# Altium PCB Pukk-Display-Module-v1.0.PcbDoc (part 3 of 5)
Units mil, origin at the board's own origin, x right, y up, seen from the top; angles counter-clockwise.
Board outline 3740.16 x 1574.8 mil, 4 copper layers (Top Layer, GND, POWER, Bottom Layer), stack 61.653 mil thick; 157 components, 115 nets, 640 pads, 314 vias.
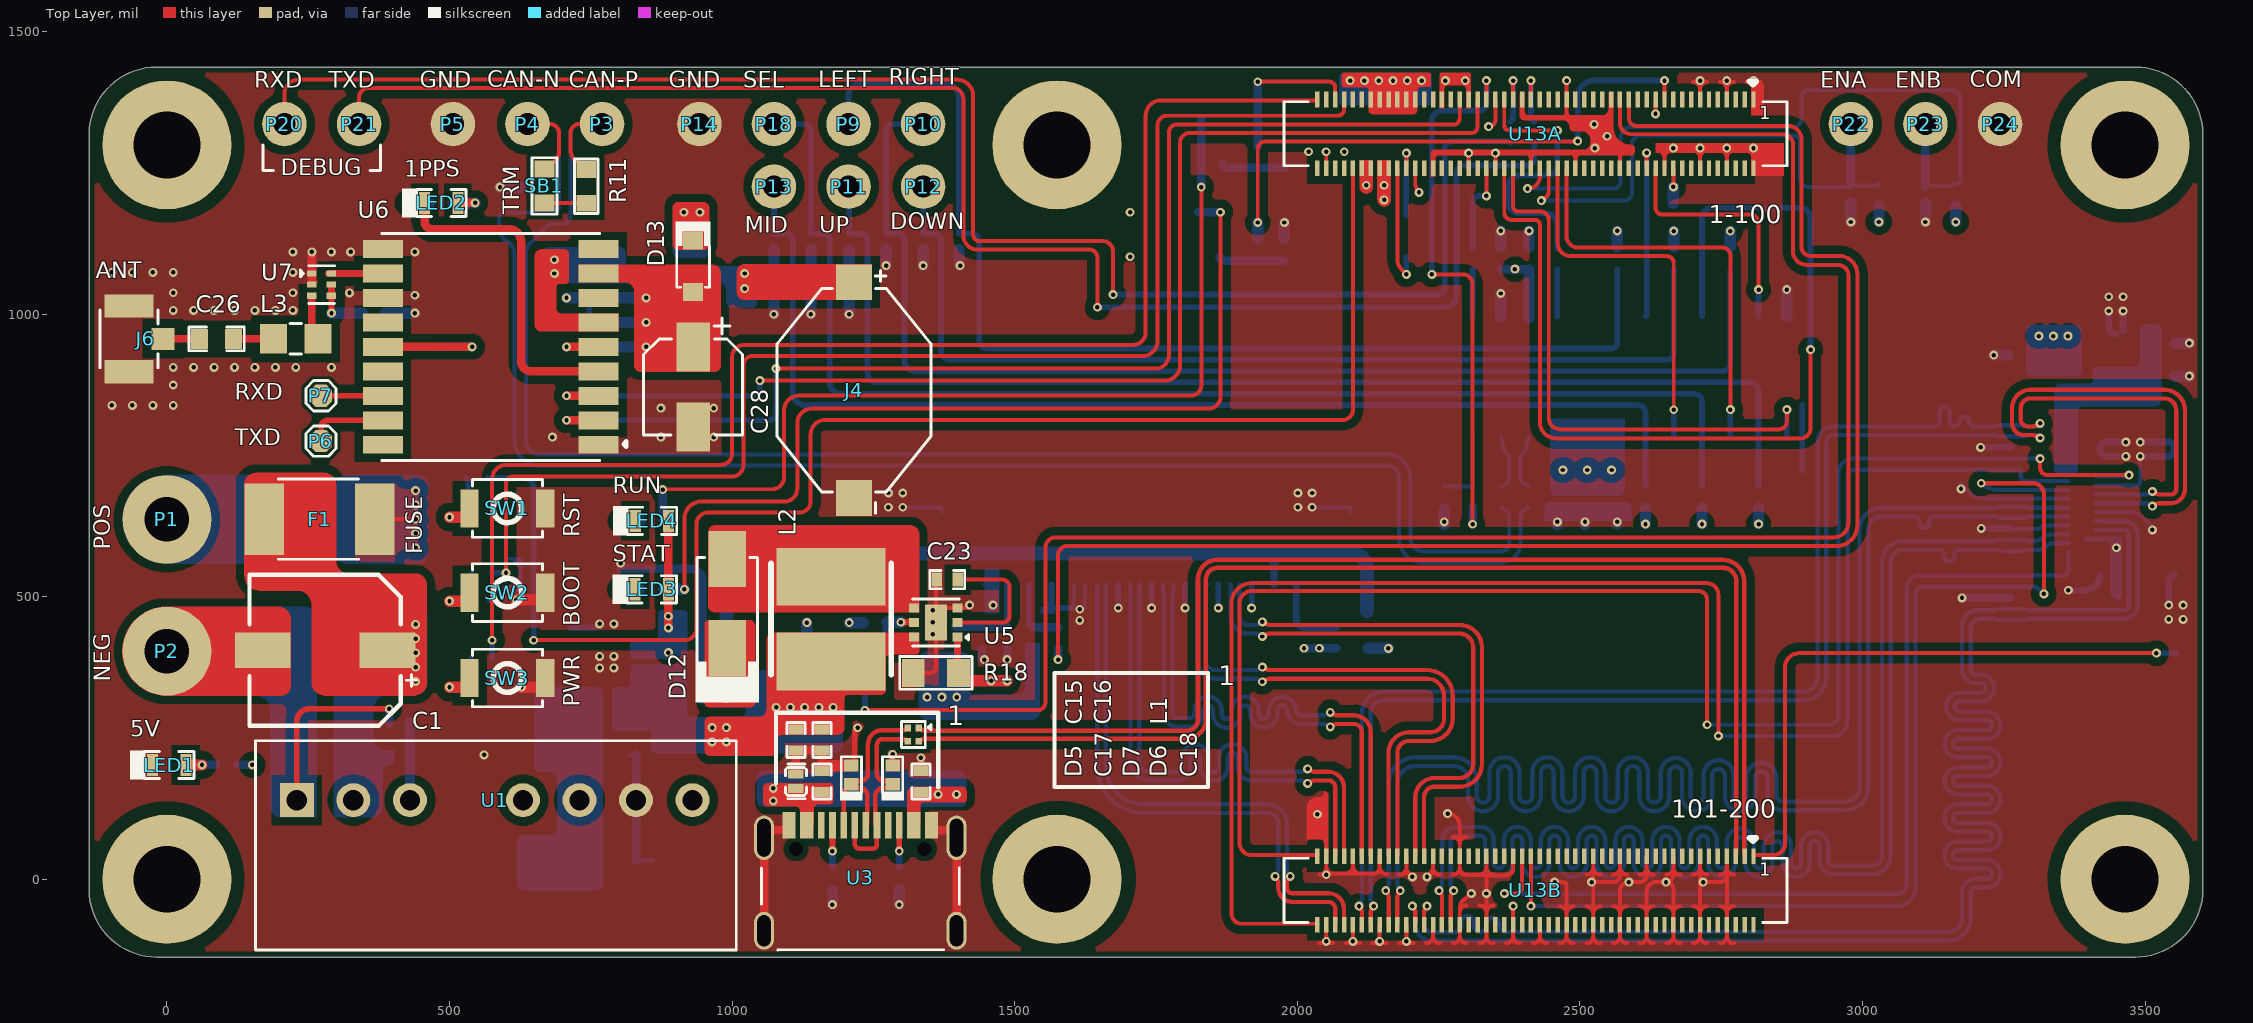
[diagram p0: Top Layer view]

## Part data (continued)
U2: "IC TRANSCEIVER 1/1 8SOIC", LCSC Part Number=C1852061, Manufacturer="Texas Instruments", Supplier Part Number=595-TCAN1044VDRQ1, Category="Interface ICs", ComponentLink1Description=http://www.ti.com/general/docs/suppproductinfo.tsp?distId=10&amp;gotoUrl=http%3A%2F%2Fwww.ti.com%2Flit%2Fgpn%2Ftcan1044-q1&src-supplier=Digikey, ComponentLink1URL=http://www.ti.com/general/docs/suppproductinfo.tsp?distId=10&amp;gotoUrl=http%3A%2F%2Fwww.ti.com%2Flit%2Fgpn%2Ftcan1044-q1&src-supplier=Digikey, Item Type=IC, Manufacturer Part Number=TCAN1044VDRQ1, Pricing="1=1.4, 10=1.19, 50=1.19, 100=0.912, 1000=0.636, 10000=0.554 (USD)", RoHS=Yes, Stock=317, Supplier=Mouser
U3: "5A 1 16P Female Type-C SMD USB Connectors ROHS", LCSC Part Number=C165948, Manufacturer="Korean Hroparts Elec", ComponentLink1Description=LCSC, ComponentLink1URL=https://www.lcsc.com/product-detail/USB-Connectors_Korean-Hroparts-Elec-TYPE-C-31-M-12_C165948.html, Item Type="USB Connector", Manufacturer Part Number=TYPE-C-31-M-12
U4: "IC CURRENT SWITCH SOT23-3", LCSC Part Number=C500764, Manufacturer=Diodes, Supplier Part Number=AP2331SA-7DICT-ND, Category="Hot Swap Controllers", ComponentLink1Description=https://datasheet.ciiva.com/15108/getdatasheetpartid-670771-15108880.pdf?src-supplier=Verical, ComponentLink1URL=https://datasheet.ciiva.com/15108/getdatasheetpartid-670771-15108880.pdf?src-supplier=Verical, ComponentLink2Description=https://datasheet.ciiva.com/4923/ap2331-6844-4923636.pdf?src-supplier=Mouser, ComponentLink2URL=https://datasheet.ciiva.com/4923/ap2331-6844-4923636.pdf?src-supplier=Mouser, ComponentLink3Description=https://datasheet.ciiva.com/8142/ap2331-8142774.pdf?src-supplier=Avnet, ComponentLink3URL=https://datasheet.ciiva.com/8142/ap2331-8142774.pdf?src-supplier=Avnet, ComponentLink4Description=https://datasheet.ciiva.com/1962/ap2331-1962167.pdf?src-supplier=Digikey, ComponentLink4URL=https://datasheet.ciiva.com/1962/ap2331-1962167.pdf?src-supplier=Digikey, ComponentLink5Description=https://datasheet.ciiva.com/1962/ap2331-1962168.pdf?src-supplier=Digikey, ComponentLink5URL=https://datasheet.ciiva.com/1962/ap2331-1962168.pdf?src-supplier=Digikey, ComponentLink6Description=https://datasheet.ciiva.com/1962/ap2331-1962169.pdf?src-supplier=Digikey, ComponentLink6URL=https://datasheet.ciiva.com/1962/ap2331-1962169.pdf?src-supplier=Digikey, Item Type=IC, Manufacturer Part Number=AP2331SA-7, Pricing="1=0.45, 10=0.383, 25=0.3572, 100=0.2859, 250=0.26548, 500=0.22464, 1000=0.17359 (USD)", RoHS=Yes, Stock=19607, Supplier=Digikey
U5: "IC LED DRV RGLTR PWM 700MA 6WSON", Manufacturer="Texas Instruments", Supplier Part Number=595-TPS61161ADRVR, Category="LED Drivers", ComponentLink1Description=https://datasheet.ciiva.com/15135/getdatasheetpartid-621302-15135612.pdf?src-supplier=Verical, ComponentLink1URL=https://datasheet.ciiva.com/15135/getdatasheetpartid-621302-15135612.pdf?src-supplier=Verical, ComponentLink2Description=https://datasheet.ciiva.com/12277/slvs937a-120933-12277974.pdf?src-supplier=Mouser, ComponentLink2URL=https://datasheet.ciiva.com/12277/slvs937a-120933-12277974.pdf?src-supplier=Mouser, ComponentLink3Description=https://datasheet.ciiva.com/1947/tps61161a-1947723.pdf?src-supplier=Digikey, ComponentLink3URL=https://datasheet.ciiva.com/1947/tps61161a-1947723.pdf?src-supplier=Digikey, ComponentLink4Description=https://datasheet.ciiva.com/1947/tps61161a-1947724.pdf?src-supplier=Digikey, ComponentLink4URL=https://datasheet.ciiva.com/1947/tps61161a-1947724.pdf?src-supplier=Digikey, ComponentLink5Description=https://datasheet.ciiva.com/1947/tps61161a-1947725.pdf?src-supplier=Digikey, ComponentLink5URL=https://datasheet.ciiva.com/1947/tps61161a-1947725.pdf?src-supplier=Digikey, ComponentLink6Description=https://datasheet.ciiva.com/3165/tps61161a-3165623.pdf?src-supplier=Avnet, ComponentLink6URL=https://datasheet.ciiva.com/3165/tps61161a-3165623.pdf?src-supplier=Avnet, Height=800um, Lead Free=5697LeadFree, Length=2mm, Manufacturer Part Number=TPS61161ADRVR, Pricing="1=1.35, 10=0.864, 50=0.864, 100=0.696, 1000=0.618, 10000=0.53 (USD)", RoHS=Yes, Stock=3931, Supplier=Mouser, Thickness=750um, Width=2mm
U6: "SMD,10.1x9.7mm Satellite Positioning Modules ROHS", LCSC Part Number=C5804601, Manufacturer=ZHONGKEWEI, Package=SMD,10.1x9.7mm, ComponentLink1Description=LCSC, ComponentLink1URL=https://www.lcsc.com/product-detail/Satellite-Positioning-Modules_ZHONGKEWEI-ATGM336H-6N-74_C5804601.html, Manufacturer Part Number=ATGM336H-6N-74
U7: "1.4V~3.6V 4.3mA DFN-6(1x1.6) Low Noise Amplifiers (LNA) - RF ROHS", LCSC Part Number=C92450, Manufacturer=ZHONGKEWEI, Package=DFN-6(1x1.6), ComponentLink1Description=LCSC, ComponentLink1URL=https://www.lcsc.com/product-detail/Low-Noise-Amplifiers-LNA-RF_ZHONGKEWEI-AT2659_C92450.html, Item Type=LNA, Manufacturer Part Number=AT2659
U8: "IC REG LINEAR 3.3V 1.3A 6DFN", LCSC Part Number=C283488, Manufacturer=STMicroelectronics, ComponentLink1Description=https://datasheet.ciiva.com/2053/cd00186925-2053848.pdf?src-supplier=Digikey, ComponentLink1URL=https://datasheet.ciiva.com/2053/cd00186925-2053848.pdf?src-supplier=Digikey, ComponentLink2Description=https://datasheet.ciiva.com/2053/cd00186925-2053849.pdf?src-supplier=Digikey, ComponentLink2URL=https://datasheet.ciiva.com/2053/cd00186925-2053849.pdf?src-supplier=Digikey, ComponentLink3Description=https://datasheet.ciiva.com/2053/cd00186925-2053850.pdf?src-supplier=Digikey, ComponentLink3URL=https://datasheet.ciiva.com/2053/cd00186925-2053850.pdf?src-supplier=Digikey, ComponentLink4Description=https://datasheet.ciiva.com/16489/cd00186925-16489850.pdf?src-supplier=Future+Electronics, ComponentLink4URL=https://datasheet.ciiva.com/16489/cd00186925-16489850.pdf?src-supplier=Future+Electronics, Item Type=IC, Manufacturer Part Number=ST1L05APU33R, Pricing="1=1.06, 10=0.766, 25=0.692, 100=0.6103, 250=0.57136, 500=0.5479, 1000=0.5286 (USD)", RoHS=Yes, Stock=7599, Supplier=Digikey
U13A U13B: "CONN RCPT 100POS SMD GOLD", Contact Resistance=90mR, Contact Voltage Rating (AC)=30V, Current Rating=300mA, Housing Color=Black, LCSC Part Number=C597931, Manufacturer=Hirose, Package Quantity=5000, ComponentLink1Description=https://datasheet.ciiva.com/11746/0900766b80e0bfd2-11746269.pdf?src-supplier=Rs, ComponentLink1URL=https://datasheet.ciiva.com/11746/0900766b80e0bfd2-11746269.pdf?src-supplier=Rs, ComponentLink2Description=https://datasheet.ciiva.com/46408/1824826-46408902.pdf?src-supplier=Element14, ComponentLink2URL=https://datasheet.ciiva.com/46408/1824826-46408902.pdf?src-supplier=Element14, Connector Type=Plug, Contact Material="Bronze,Copper Alloy", Contact Pitch=400um, Contact Plating=Gold, Contact Voltage Rating (DC)=30V, Housing Material=Polymer, Item Type="Headers and Wire Housings", Lead Free="Lead Free", Manufacturer Part Number=DF40C-30DP-0.4V(51), Mated Stacking Heights=4mm, Mounting Technology="Surface Mount", Number of Contacts=30, Number of Positions=30, Number of Rows=2, Orientation=Straight, Packaging="Tape and Reel", Pitch=0.4mm, Pricing="5000=0.405 (USD)", Reach SVHC Compliant=No, RoHS=Yes, RoHS Compliant=Yes, Series=DF40, Stock=10000, Supplier="Future Electronics", Termination=SMD/SMT, Voltage Rating=30V
U16: "IC INVERT SCHMITT 6CH 1IN 14SOIC", Case/Package=SOIC, High Level Output Current=-5.2mA, LCSC Part Number=C507235, Low Level Output Current=5.2mA, Manufacturer="Texas Instruments", Max Operating Temperature=125°C, Max Supply Voltage=6V, Min Operating Temperature=-40°C, Min Supply Voltage=2V, Operating Supply Voltage=5V, Output Current=25mA, Package Quantity=1, Quiescent Current=2uA, Supplier Part Number=595-SN74HC14QDRQ1, Category="Logic Gates", ComponentLink1Description=https://datasheet.ciiva.com/15089/getdatasheetpartid-126971-15089251.pdf?src-supplier=Verical, ComponentLink1URL=https://datasheet.ciiva.com/15089/getdatasheetpartid-126971-15089251.pdf?src-supplier=Verical, ComponentLink2Description=https://datasheet.ciiva.com/1864/sn74hc14-q1-1864939.pdf?src-supplier=Digikey, ComponentLink2URL=https://datasheet.ciiva.com/1864/sn74hc14-q1-1864939.pdf?src-supplier=Digikey, ComponentLink3Description=https://datasheet.ciiva.com/1864/sn74hc14-q1-1864938.pdf?src-supplier=Digikey, ComponentLink3URL=https://datasheet.ciiva.com/1864/sn74hc14-q1-1864938.pdf?src-supplier=Digikey, ComponentLink4Description=https://datasheet.ciiva.com/1864/sn74hc14-q1-1864940.pdf?src-supplier=Digikey, ComponentLink4URL=https://datasheet.ciiva.com/1864/sn74hc14-q1-1864940.pdf?src-supplier=Digikey, ComponentLink5Description=https://datasheet.ciiva.com/14288/sn74hc14-q1-14288654.pdf?src-supplier=Avnet, ComponentLink5URL=https://datasheet.ciiva.com/14288/sn74hc14-q1-14288654.pdf?src-supplier=Avnet, ComponentLink6Description=https://datasheet.ciiva.com/48703/001073384-da-01-en-ic-hex-schmitt-sn74hc14qdrq1-soic-14-tid-48703180.pdf?src-supplier=Conrad, ComponentLink6URL=https://datasheet.ciiva.com/48703/001073384-da-01-en-ic-hex-schmitt-sn74hc14qdrq1-soic-14-tid-48703180.pdf?src-supplier=Conrad, Height=1.58mm, Input Type="SCHMITT TRIGGER", Item Type=IC, Lead Free="Lead Free", Length=8.65mm, Logic Function="Buffer,Inverter,Schmitt Trigger", Manufacturer Part Number=SN74HC14QDRQ1, Mounting Technology="Surface Mount", Number of Bits=6, Number of Circuits=6, Number of Elements=6, Number of Gates=6, Number of Inputs=6, Packaging="Tape and Reel", Pins=14, Pricing="1=0.68, 10=0.601, 50=0.601, 100=0.503, 1000=0.392, 10000=0.3 (USD)", Propagation Delay=21ns, Radiation Hardening=No, Reach SVHC Compliant=No, RoHS=Yes, RoHS Compliant=Yes, Schmitt Trigger Input=Yes, Series=74HC, Stock=6966, Supplier=Mouser, Technology=CMOS, Turn-On Delay Time=21ns, Weight=0.004318oz, Width=3.91mm

## Free pads (board coordinates)
  round 228.35 hole 118.11: MH(0,0) MH(0,1299.21) SH1(1574.8,1299.21) SH2(3464.57,1299.21) SH3(1574.8,0) SH4(3464.57,0)

## Via types
v1: diameter 15.75, hole 7.87, Top Layer to Bottom Layer, tented both sides, 314 vias

## Nets (pads, with @x,y where several pads share a name; then routed paths per layer and width w, separated by ;. In a path a pad name is that pad's centre, name@x,y a point inside that pad or via, vN(x,y) a via of type N, cw(c..) or ccw(c..) an arc to the next point about the centre after c; other vN are vias at no path point)
BUTTON_CENTER: U13A.46 U16.12 | length 663
  Top Layer w7: U13A.46@2460.63,1256.69 2460.63,1125.91 ccw(c2484.23,1125.91) 2484.23,1102.31 2653.9,1102.31 cw(c2653.9,1090.2) 2666,1090.2 v1(2666,830.6)
  Bottom Layer w10: U16.12@2666,783.7 v1(2666,830.6)
BUTTON_CENTER#: D23.2 P13.1 R37.1 U16.13 | length 2051.7
  Bottom Layer w10: P13.1@1074,1225.4 D23.2@1074,1142 1097.83,1142 cw(c1097.83,1132.65) 1107.18,1132.65 1107.18,861.18 ccw(c1129.44,861.18) 1129.44,838.92 2602.08,838.92 cw(c2602.08,825) 2616,825 U16.13@2616,783.7 R37.1@2616,696.13
BUTTON_DOWN: U13A.58 U16.4 | length 1766.9
  Top Layer w7: U13A.58@2366.14,1258.26 2366.14,1179.87 ccw(c2379.5,1179.87) 2379.5,1166.5 2420.01,1166.5 cw(c2420.01,1157.38) 2429.13,1157.38 2429.13,808.87 ccw(c2458,808.87) 2458,780 2889.97,780 ccw(c2889.97,798.03) 2908,798.03 v1(2908,937)
  Bottom Layer w10: U16.4@2716,996.3 2716,1170.43 cw(c2733.71,1170.43) 2733.71,1188.15 2889.71,1188.15 cw(c2889.71,1169.86) 2908,1169.86 v1(2908,937)
BUTTON_DOWN#: D22.2 P12.1 R122.1 U16.3 | length 1776.9
  Bottom Layer w10: P12.1@1338,1225.4 D22.2@1338,1142 1357.36,1142 cw(c1357.36,1129.68) 1369.68,1129.68 1369.68,934.6 ccw(c1385.24,934.6) 1385.24,919.05 2653.31,919.05 ccw(c2653.31,931.74) 2666,931.74 U16.3@2666,996.3 R122.1@2666,1079
BUTTON_LEFT: U13A.26 U16.2 | length 318.2
  Top Layer w7: U13A.26@2618.11,1256.69 v1(2618.11,1285)
  Bottom Layer w10: U16.2@2616,996.3 ccw(c2616,998.41) 2618.11,998.41 v1(2618.11,1285)
BUTTON_LEFT#: D19.2 P9.1 R121.1 U16.1 | length 2004.8
  Bottom Layer w10: P9.1@1206,1336 1206,1389 cw(c1224,1389) 1224,1407 1378,1407 cw(c1378,1384) 1401,1384 1401,1142 1423.39,1142 cw(c1423.39,1128.2) 1437.19,1128.2 1437.19,953.82 ccw(c1451.94,953.82) 1451.94,939.08 2556.11,939.08 ccw(c2556.11,948.97) 2566,948.97 U16.1@2566,996.3 R121.1@2566,1079
BUTTON_RIGHT: U13A.24 U16.6 | length 431
  Top Layer w7: U13A.24@2633.85,1256.69 2633.85,1187.81 ccw(c2645.67,1187.81) 2645.67,1176 2801.05,1176 cw(c2801.05,1161.05) 2816,1161.05 v1(2816,1043.19)
  Bottom Layer w10: U16.6@2816,996.3 v1(2816,1043.19)
BUTTON_RIGHT#: D20.2 P10.1 R123.1 U16.5 | length 2150.5
  Bottom Layer w10: D20.2@1272.5,1142 1293.7,1142 cw(c1293.7,1130.7) 1305,1130.7 1305,917.35 ccw(c1323.33,917.35) 1323.33,899.01 2752.17,899.01 ccw(c2752.17,912.84) 2766,912.84 U16.5@2766,996.3 R123.1@2766,1079 ; D20.2@1272.88,1143.62 1272.88,1324.88 cw(c1284,1324.88) 1284,1336 P10.1@1338,1336
BUTTON_SELECT: U13A.44 U16.10 | length 748
  Top Layer w7: U13A.44@2476.37,1256.69 2476.37,1137.72 ccw(c2496.42,1137.72) 2496.42,1117.68 2751.49,1117.68 cw(c2751.49,1102.9) 2766.27,1102.9 v1(2766.27,830.87)
  Bottom Layer w7: U16.10@2766,783.7 U16.10@2766.27,783.97
  Bottom Layer w10: U16.10@2766.27,783.97 v1(2766.27,830.87)
BUTTON_SELECT#: D14.2 P18.1 R125.1 U16.11 | length 2255.8
  Bottom Layer w10: P18.1@1074,1336 1128,1336 cw(c1128,1324.88) 1139.12,1324.88 D14.2@1139.12,1143.62 ; D14.2@1139.5,1142 1161.96,1142 cw(c1161.96,1131.08) 1172.88,1131.08 1172.88,878.41 ccw(c1192.34,878.41) 1192.34,858.95 2701.31,858.95 cw(c2701.31,844.26) 2716,844.26 U16.11@2716,783.7 R125.1@2716,696.13
BUTTON_UP: U13A.56 U16.8 | length 1002.8
  Top Layer w7: U13A.56@2381.89,1258.26 2381.89,1190.83 ccw(c2391.49,1190.83) 2391.49,1181.23 2429.67,1181.23 cw(c2429.67,1166.02) 2444.88,1166.02 2444.88,816.12 ccw(c2465,816.12) 2465,796 2852.08,796 ccw(c2852.08,810.05) 2866.14,810.05 v1(2866.13,830.73)
  Bottom Layer w10: U16.8@2866.13,783.84 v1(2866.13,830.73)
BUTTON_UP#: D21.2 P11.1 R124.1 U16.9 | length 2120.3
  Bottom Layer w10: P11.1@1206,1225.4 cw(c1206,1224.4) 1207,1224.4 D21.2@1207,1142 1228.31,1142 cw(c1228.31,1130.71) 1239.6,1130.71 1239.6,896.37 ccw(c1256.99,896.37) 1256.99,878.98 2801.57,878.98 cw(c2801.57,864.55) 2816,864.55 U16.9@2816,783.7 R124.1@2816,696.13
CAN0_RX_M1: R10.1 U13A.57 | length 493.4
  Top Layer w7: U13A.57@2366.14,1377.95 2366.14,1333.81 ccw(c2374.95,1333.81) 2374.95,1325 v1(2460,1325)
  Bottom Layer w10: R10.1@2460,1116 2460,1157.84 ccw(c2439.76,1157.84) 2439.76,1178.08 2392.51,1178.08 cw(c2392.51,1198.09) 2372.5,1198.09 2372.5,1223.99 cw(c2393.78,1223.99) 2393.78,1245.28 2443.21,1245.28 ccw(c2443.21,1262.07) 2460,1262.07 v1(2460,1325)
CAN0_TX_M1: R8.1 U13A.62 | length 160.3
  Top Layer w7: v1(2334.64,1209) U13A.62@2334.64,1256.69
  Bottom Layer w10: R8.1@2310,1116 2310,1197.19 cw(c2321.81,1197.19) 2321.81,1209 v1(2334.64,1209)